# EAGLE board Spectacular Kieran (2) (EAGLE 9.7.0)

Size 371 x 127.12 mm. Coordinates in mm from the lower left corner, seen from the top.
Outline: 0,0 371,0 371,127.12 0,127.12 0,0
Copper layers (1*16): Top 0.035mm / dielectric 1.5mm / Bottom 0.035mm
Design rules "default": minimum track width 6mil, minimum drill 0.35mm, track to track 6mil, track to pad 6mil, pad to pad 6mil, via to via 6mil, smd to smd 6mil, copper to edge 40mil, drill to drill 6mil, minimum pad ring 10mil, minimum via ring 8mil, stop-mask expansion 4mil, vias tented up to drill 0mil, thermal gap 10mil

## Footprints (pad centres in the part's own frame; a part is rotated, then mirrored left to right if it is on the bottom)
CAP-THRU-2.54MM = drill 1.016 pad 1.88: 1 -1.27,0; 2 1.27,0
CAPPRD254W65D500H1150B = drill 0.85 pad 1.45: 1 -1.27,0; 2 1.27,0
LEDRD254W60D565H860B_Y = drill 0.981 pad 1.581: 1 -1.27,0; 2 1.27,0
INDRD2743W50D3810H2616B = drill 0.708 pad 1.308: 1 -13.716,0; 2 13.716,0
BATTERY-GENERIC = drill 1.118 pad 3.15 octagon: + 2.54,0; - -2.54,0
RESAD1016W63L850D250B = drill 0.83 pad 1.43: 1 -5.08,0; 2 5.08,0

## Placement (x,y rotation side)
CC1  68n  [CAP-THRU-2.54MM]  8.26,105.53 0 top
CC2  47n  [CAP-THRU-2.54MM]  5.71,82.67 0 top
CC3  56u  [CAPPRD254W65D500H1150B]  27.3,105.53 180 top
D5  YELLOW  [LEDRD254W60D565H860B_Y]  338,14.31 180 top
D6  YELLOW  [LEDRD254W60D565H860B_Y]  351.86,14.31 180 top
D7  YELLOW  [LEDRD254W60D565H860B_Y]  324.67,14.05 180 top
D8  YELLOW  [LEDRD254W60D565H860B_Y]  364.94,14.31 180 top
D9  YELLOW  [LEDRD254W60D565H860B_Y]  364.15,33.66 180 top
D10  YELLOW  [LEDRD254W60D565H860B_Y]  363.1,51.7 180 top
D11  YELLOW  [LEDRD254W60D565H860B_Y]  351.34,33.66 180 top
D12  YELLOW  [LEDRD254W60D565H860B_Y]  324.93,51.44 180 top
D13  YELLOW  [LEDRD254W60D565H860B_Y]  324.67,33.4 180 top
D14  YELLOW  [LEDRD254W60D565H860B_Y]  338,33.66 180 top
D15  YELLOW  [LEDRD254W60D565H860B_Y]  336.96,51.44 180 top
D16  YELLOW  [LEDRD254W60D565H860B_Y]  350.82,51.44 180 top
LL1  5m  [INDRD2743W50D3810H2616B]  24.77,85.21 0 top
LL2  4m  [INDRD2743W50D3810H2616B]  47.62,102.99 0 top
P1  BATTERYGENERIC  [BATTERY-GENERIC]  272.11,70.27 180 top
R1  220  [RESAD1016W63L850D250B]  323.66,46.36 90 top
R2  220  [RESAD1016W63L850D250B]  323.4,28.32 90 top
R3  220  [RESAD1016W63L850D250B]  323.4,8.97 90 top

## Library data of the parts
CC1-CC3 P1 R1-R3 = Tinkercad
D5-D16 = Tinkercad; CATEGORY: Opto-Electronic; SUB-CATEGORY: LED; VALUE: LED_YELLOW
LL1 LL2 = Tinkercad; CATEGORY: Inductor; SUB-CATEGORY: Fixed

## Nets
D5_A: D5.1 D6.2
D6_A: D6.1 D8.2
D7_A: D5.2 D7.1
D7_C: D7.2 R3.2
D9_C: D9.2 D11.1
D11_C: D11.2 D14.1
D12_A: D12.1 D15.2
D12_C: D12.2 R1.2
D13_A: D13.1 D14.2
D13_C: D13.2 R2.2
D15_A: D15.1 D16.2
D16_A: D10.2 D16.1
P1+: D8.1 D9.1 D10.1 P1.+
P1-: P1.- R1.1 R2.1 R3.1

## Tracks (layer width: path | path; a pad name or v marks a point on that pad's centre or on a via)
D5_A  (1 unrouted)
D6_A  (1 unrouted)
D7_A  (1 unrouted)
D7_C  (1 unrouted)
D9_C  (1 unrouted)
D11_C  (1 unrouted)
D12_A  (1 unrouted)
D12_C  (1 unrouted)
D13_A  (1 unrouted)
D13_C  (1 unrouted)
D15_A  (1 unrouted)
D16_A  (1 unrouted)
P1+  (3 unrouted)
P1-  (3 unrouted)